# Altium PCB SPSU-Old.PcbDoc
Units mm, origin at the board's own origin, x right, y up, seen from the top; angles counter-clockwise.
Board outline 44.65 x 54.4 mm, 2 copper layers (Top, Bottom); 44 components, 39 nets, 162 pads, 320 vias.
Unrouted connection lines stored in the file: 2.
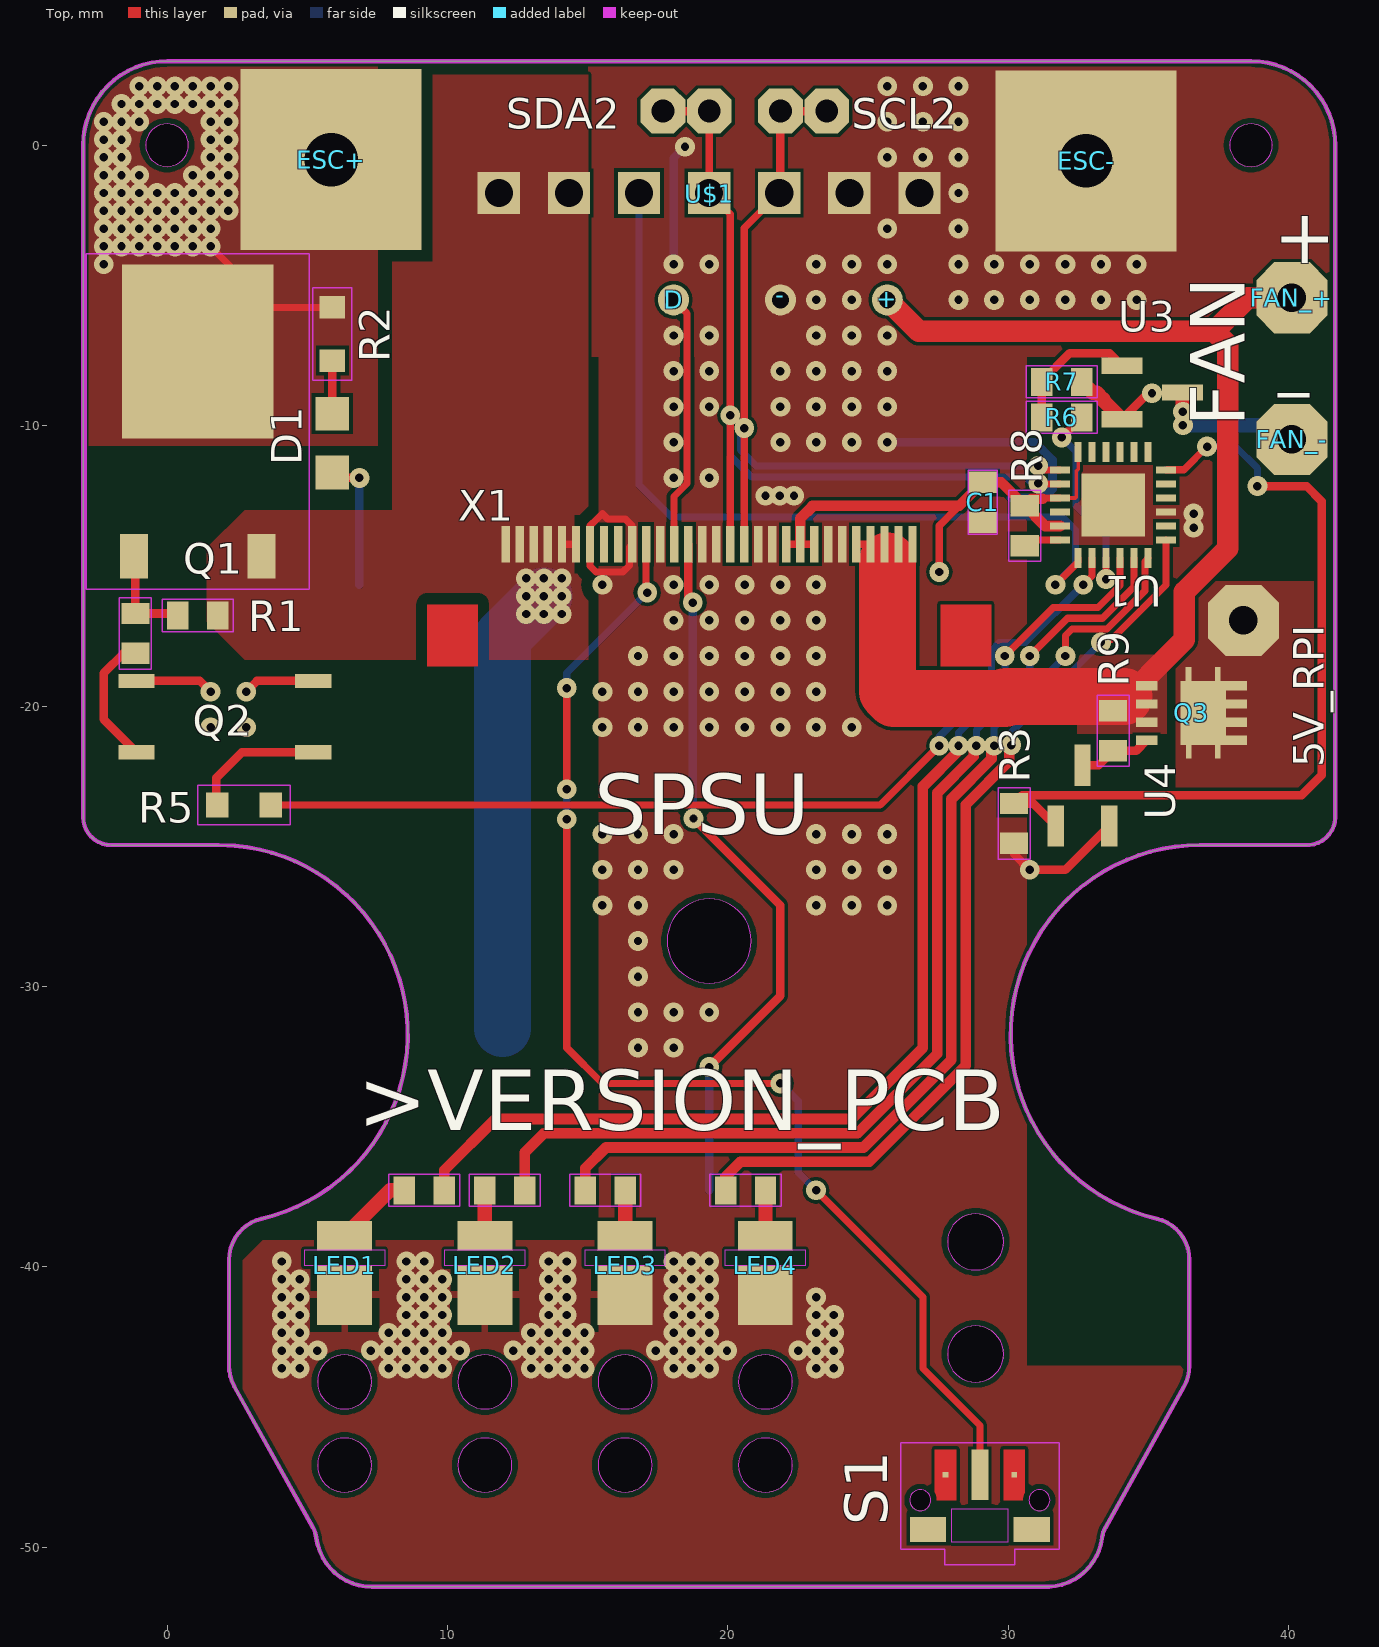
[diagram p0: Top view]
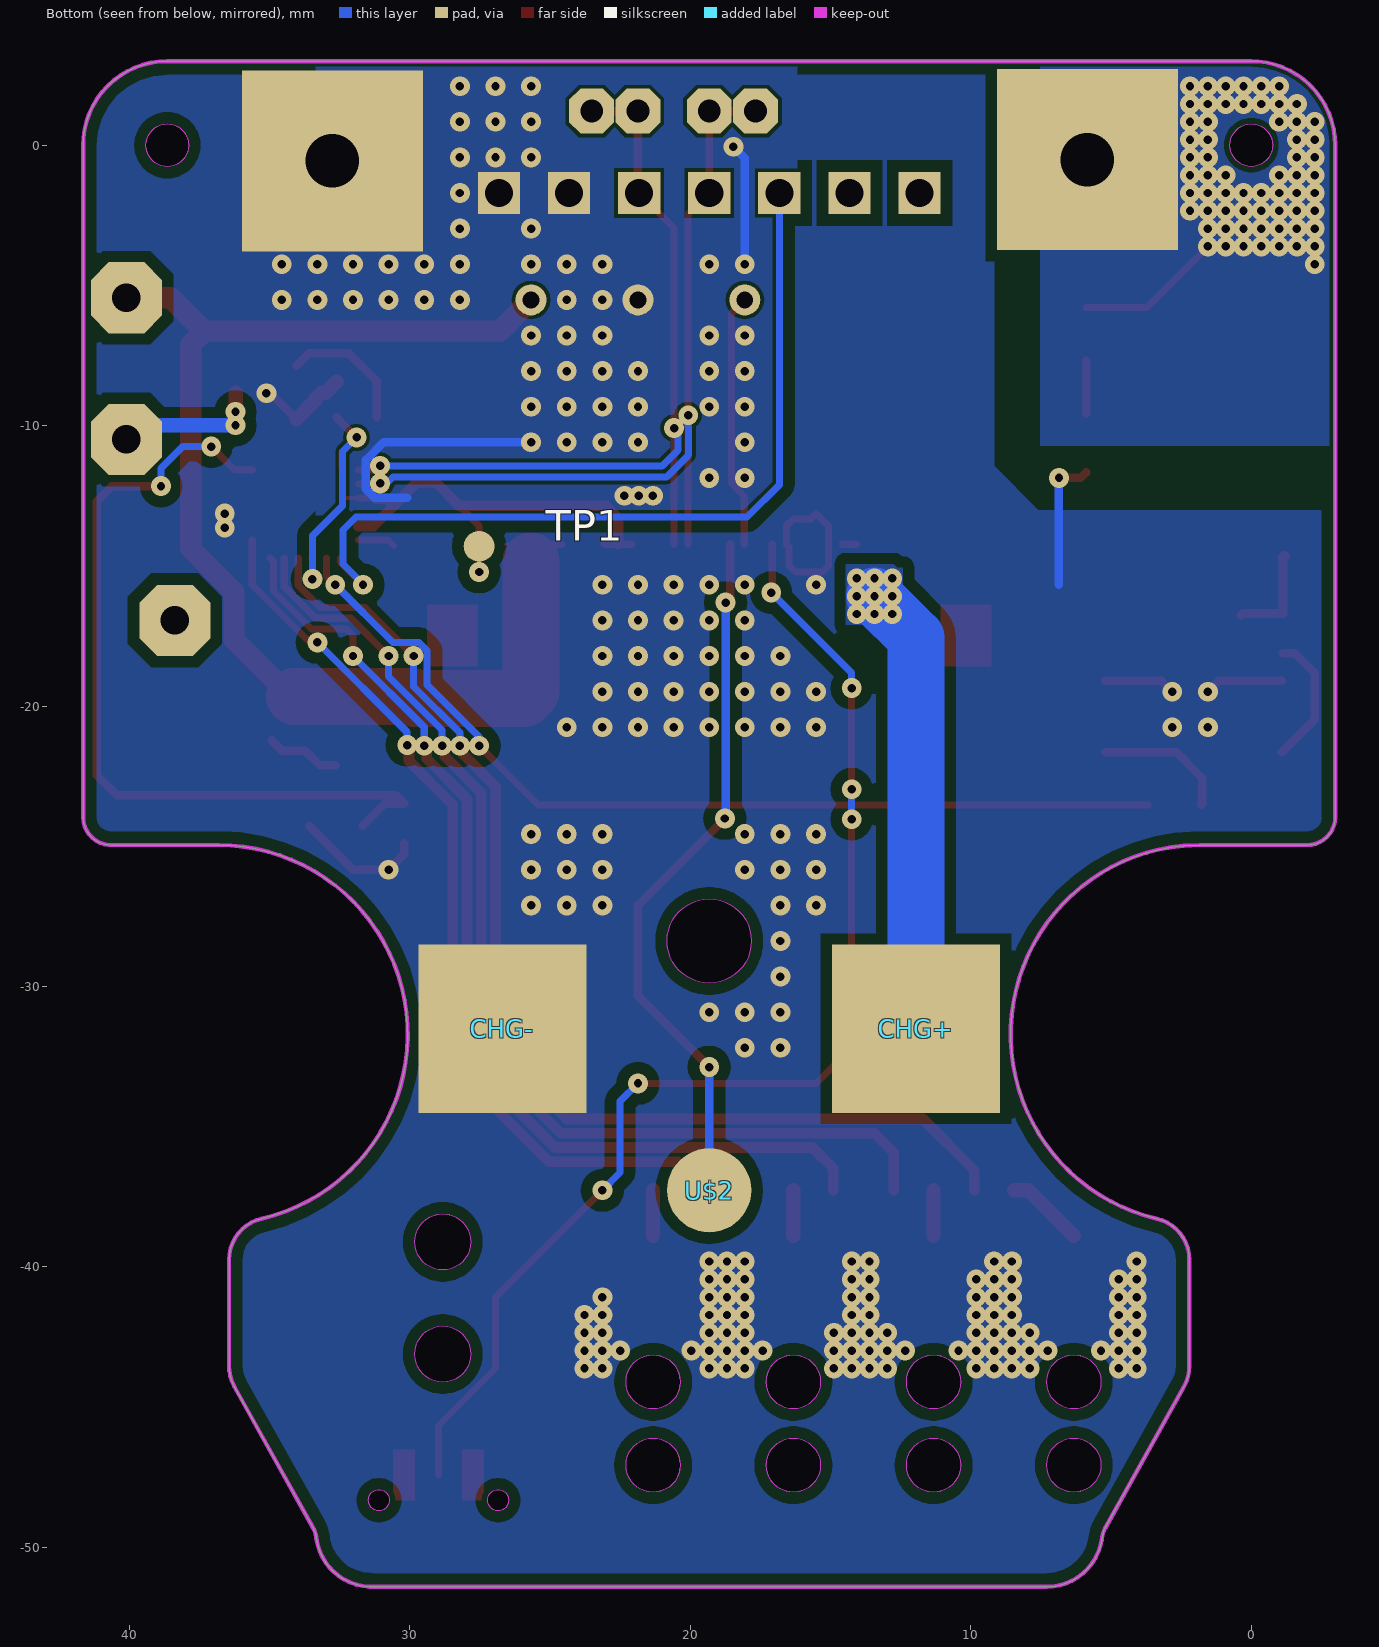
[diagram p1: Bottom view, seen from below]

## Layer stack, top to bottom
Top Solder: solder mask 0.0102, Solder Resist, Dk 3.5
Top: signal copper 0.035
Dielectric 1: dielectric 0.32, FR-4, Dk 4.8
Bottom: signal copper 0.035
Bottom Solder: solder mask 0.0102, Solder Resist, Dk 3.5

## Board outline
33.36,-49.536 33.343,-49.621 33.338,-49.655 cw(c31.354,-49.406) 31.453,-51.404 31.354,-51.406 7.307,-51.406 cw(c7.307,-49.406) 5.375,-49.924 5.337,-49.754 5.322,-49.655 5.286,-49.485 5.256,-49.403 5.22,-49.324 5.204,-49.294 2.399,-44.26 cw(c3.709,-43.529) 2.209,-43.53 2.209,-39.739 cw(c3.709,-39.739) 3.367,-38.279 ccw(c1.83,-31.706) 2.418,-24.982 1.83,-24.956 -1.993,-24.956 cw(c-1.993,-23.956) -2.993,-23.956 -2.993,-0.004 cw(c0.007,-0.004) -0.255,2.985 0.007,2.996 38.653,2.996 cw(c38.654,-0.004) 41.642,0.258 41.653,-0.004 41.653,-23.956 cw(c40.654,-23.956) 40.741,-24.952 40.653,-24.956 36.83,-24.956 ccw(c36.83,-31.706) 35.293,-38.279 cw(c34.951,-39.739) 36.451,-39.739 36.451,-43.53 cw(c34.951,-43.529) 36.262,-44.26 33.457,-49.294 ccw(c34.33,-49.781) 33.385,-49.453
cut-out: 19.33,-29.876 ccw(c19.33,-28.376) 20.83,-28.376 ccw(c19.33,-28.376) 19.33,-26.876 ccw(c19.33,-28.376) 17.83,-28.376 ccw(c19.33,-28.376)
cut-out: 28.83,-40.104 ccw(c28.83,-39.104) 29.83,-39.104 ccw(c28.83,-39.104) 28.83,-38.104 ccw(c28.83,-39.104) 27.83,-39.104 ccw(c28.83,-39.104)
cut-out: 28.83,-44.104 ccw(c28.83,-43.104) 29.83,-43.104 ccw(c28.83,-43.104) 28.83,-42.104 ccw(c28.83,-43.104) 27.83,-43.104 ccw(c28.83,-43.104)
cut-out: 16.33,-45.061 ccw(c16.33,-44.096) 17.295,-44.096 ccw(c16.33,-44.096) 16.33,-43.131 ccw(c16.33,-44.096) 15.365,-44.096 ccw(c16.33,-44.096)
cut-out: 11.33,-48.031 ccw(c11.33,-47.066) 12.295,-47.066 ccw(c11.33,-47.066) 11.33,-46.101 ccw(c11.33,-47.066) 10.365,-47.066 ccw(c11.33,-47.066)
cut-out: 16.33,-48.031 ccw(c16.33,-47.066) 17.295,-47.066 ccw(c16.33,-47.066) 16.33,-46.101 ccw(c16.33,-47.066) 15.365,-47.066 ccw(c16.33,-47.066)
cut-out: 21.33,-45.061 ccw(c21.33,-44.096) 22.295,-44.096 ccw(c21.33,-44.096) 21.33,-43.131 ccw(c21.33,-44.096) 20.365,-44.096 ccw(c21.33,-44.096)
cut-out: 21.33,-48.031 ccw(c21.33,-47.066) 22.295,-47.066 ccw(c21.33,-47.066) 21.33,-46.101 ccw(c21.33,-47.066) 20.365,-47.066 ccw(c21.33,-47.066)
cut-out: 6.33,-45.061 ccw(c6.33,-44.096) 7.295,-44.096 ccw(c6.33,-44.096) 6.33,-43.131 ccw(c6.33,-44.096) 5.365,-44.096 ccw(c6.33,-44.096)
cut-out: 11.33,-45.061 ccw(c11.33,-44.096) 12.295,-44.096 ccw(c11.33,-44.096) 11.33,-43.131 ccw(c11.33,-44.096) 10.365,-44.096 ccw(c11.33,-44.096)
cut-out: 6.33,-48.031 ccw(c6.33,-47.066) 7.295,-47.066 ccw(c6.33,-47.066) 6.33,-46.101 ccw(c6.33,-47.066) 5.365,-47.066 ccw(c6.33,-47.066)
cut-out: 38.651,-0.765 ccw(c38.651,-0.003) 39.413,-0.003 ccw(c38.651,-0.003) 38.651,0.759 ccw(c38.651,-0.003) 37.889,-0.003 ccw(c38.651,-0.003)
cut-out: 0,-0.762 ccw(c0,0) 0.762,0 ccw(c0,0) 0,0.762 ccw(c0,0) -0.762,0 ccw(c0,0)
cut-out: 31.107,-48.69 ccw(c31.107,-48.315) 31.482,-48.315 ccw(c31.107,-48.315) 31.107,-47.94 ccw(c31.107,-48.315) 30.732,-48.315 ccw(c31.107,-48.315)
cut-out: 26.857,-48.69 ccw(c26.857,-48.315) 27.232,-48.315 ccw(c26.857,-48.315) 26.857,-47.94 ccw(c26.857,-48.315) 26.482,-48.315 ccw(c26.857,-48.315)

## Design rules (kind name [scope] priority, off if disabled: settings)
BoardOutlineClearance mdCopperDimension [All] p1: gap=0.254 ignorepadtopadclearanceinfootprint=FALSE except(0: Arc-SplitContinuation Track-SplitContinuation SMDPad-SplitContinuation THPad-SplitContinuation Via-SplitContinuation Fill-SplitContinuation Poly-SplitContinuation Region-SplitContinuation Text-SplitContinuation; 0.2: Poly-OutlineEdge Poly-CavityEdge Poly-CutoutEdge Poly-SplitBarrior)
Clearance Clearance_for_PolygonClass_Isolate_16 [InPolygonClass('Isolate_16') vs IsArc Or IsTrack Or IsPad Or IsVia Or IsFill Or IsRegion Or IsText] p1: gap=0.406 ignorepadtopadclearanceinfootprint=FALSE
Clearance "Clearance (Same Net)" [All] p2: gap=0.127 ignorepadtopadclearanceinfootprint=FALSE
Clearance [All] p3: gap=0.127 ignorepadtopadclearanceinfootprint=FALSE
HoleSize [All] p1: absolutevalues=TRUE maxlimit=2540 minlimit=0.3 maxpercent=80.000 minpercent=20.000
HoleToHoleClearance mdDrill [All] p1: gap=0.152 allowstackedmicrovias=TRUE
MinimumSolderMaskSliver [All] p1 off: minsoldermaskwidth=0.254
PasteMaskExpansion Expansion_SMDPaste_OFF [InPadClass('SMDPaste_OFF')] p1: expansion=0
PasteMaskExpansion mlMinCreamFrame [All] p2: expansion=0
PolygonConnect PolygonConnect_For_PolygonThermal_ON_Width100000_Gap100000 [InPolygonClass('PolygonThermal_ON_Width100000_Gap100000') vs Not IsVia] p1: connectstyle=Relief reliefconductorwidth=0.254 reliefentries=4 polygonreliefangle="90 Angle" airgapwidth=0.254
PolygonConnect PolygonConnect_For_PolygonThermal_OFF [InPolygonClass('PolygonThermal_OFF')] p2: connectstyle=Direct reliefconductorwidth=0.254 reliefentries=4 polygonreliefangle="90 Angle" airgapwidth=0.254
PolygonConnect ThermalVias [IsVia] p3: connectstyle=Direct reliefconductorwidth=0.254 reliefentries=4 polygonreliefangle="90 Angle" airgapwidth=0.254
PolygonConnect [All] p4: connectstyle=Relief reliefconductorwidth=0.254 reliefentries=4 polygonreliefangle="90 Angle" airgapwidth=0.254
RoutingVias [All] p1: holewidth=0.3 width=0.452 viastyle="Through Hole" minholewidth=0.3 minwidth=0.452 maxholewidth=2.54 maxwidth=2.54
SolderMaskExpansion Expansion_SMDSolder_OFF [InPadClass('SMDSolder_OFF')] p1: expansion=0 istentingtop=FALSE
SolderMaskExpansion mlMinStopFrame [All] p2: expansion=0.102 istentingtop=FALSE
Width [All] p1: maxlimit=0.254 minlimit=0.127 preferedwidth=0.127
26 further rules are at their usual default settings.

## Classes and differential pairs
polygon class PolygonThermal_ON_Width100000_Gap100000: Polygon_3_Net_+12V Polygon_4_Net_0V
polygon class PolygonThermal_OFF: C Polygon_1_Net_0V Polygon_1_Net_+5V Polygon_1_Net_+5V_RPI Polygon_1_Net_ESC_+ Polygon_2_Net_+12V Polygon_2_Net_ESC_+ Polygon_3_Net_0V Polygon_5_Net_0V Polygon_6_Net_0V
polygon class Isolate_16: C Polygon_2_Net_+12V
pad class SMDSolder_OFF: S1-1 S1-3 X1-1 X1-2 X1-3 X1-4 X1-5 X1-6 X1-7 X1-8 X1-9 X1-10 X1-11 X1-12 X1-13 X1-14 X1-15 X1-16 X1-17 X1-18 X1-19 X1-20 X1-21 X1-22 X1-23 X1-24 X1-25 X1-26 X1-27 X1-28 X1-29 X1-30
pad class SMDPaste_OFF: S1-1 S1-3 TP1-TP X1-1 X1-2 X1-3 X1-4 X1-5 X1-6 X1-7 X1-8 X1-9 X1-10 X1-11 X1-12 X1-13 X1-14 X1-15 X1-16 X1-17 X1-18 X1-19 X1-20 X1-21 X1-22 X1-23 X1-24 X1-25 X1-26 X1-27 X1-28 X1-29 X1-30

## Components (designator, comment, footprint, x,y, rotation, side; value= is the part's Value field where it differs from the comment)
5V_RPI "WIREPAD2,54/1,0" 2,54/1,0 38.38,-16.946 r90 top
+ "" TH-0.75/0.6 25.68,-5.516 r0 top
- "" TH-0.75/0.6 21.87,-5.516 r0 top
C1 "100nF" C0603 29.084,-12.734 r90 top
CHG+ "" SMT-PAD_SQ6MM 11.957,-31.504 r180 bottom
CHG- "" SMT-PAD_SQ6MM 26.703,-31.504 r180 bottom
D "" TH-0.75/0.6 18.06,-5.516 r0 top
D1 "" CHIPLED_0805 5.894,-10.622 r180 top
ESC+ "" ESC 5.849,-0.519 r180 top
ESC- "" ESC 32.767,-0.563 r0 top
FAN_+ "WIREPAD2,54/1,0" 2,54/1,0 40.107,-5.44 r0 top
FAN_- "WIREPAD2,54/1,0" 2,54/1,0 40.107,-10.495 r0 top
LED1 "JE2835AWTLED_JE2835_CRW-L" LED_JE2835_CRW-L 6.33,-40.206 r90 top
LED2 "JE2835AWTLED_JE2835_CRW-L" LED_JE2835_CRW-L 11.33,-40.206 r90 top
LED3 "JE2835AWTLED_JE2835_CRW-L" LED_JE2835_CRW-L 16.33,-40.206 r90 top
LED4 "JE2835AWTLED_JE2835_CRW-L" LED_JE2835_CRW-L 21.33,-40.206 r90 top
Q1 "FDD4141TO252" TO252 1.093,-9.86 r0 top
Q2 "EL357N" EL357N(C)(TA)-VG_EVE-L 2.058,-20.375 r180 top
Q3 "" POWERDI3333-8_3P3X3P3_DIO 36.526,-20.248 r0 top
R1 "100k" R0603#1 1.093,-16.768 r0 top
R2 "150" R0603#2 5.894,-6.735 r270 top
R3 "100k" R0603#1 30.201,-24.185 r90 top
R4 "4k7" R0603#1 -1.13,-17.41 r270 top
R5 "200" R0603#2 2.744,-23.525 r180 top
R6 "4k7" R0603#1 31.903,-9.707 r0 top
R7 "100k" R0603#1 31.903,-8.437 r180 top
R8 "100k" R0603#1 30.582,-13.568 r270 top
R9 "100k" R0603#1 33.732,-20.883 r90 top
R10 "150R" R0603#1 9.17,-37.266 r0 top
R11 "150R" R0603#1 12.04,-37.266 r0 top
R12 "150R" R0603#1 15.622,-37.266 r180 top
R13 "150R" R0603#1 20.626,-37.266 r180 top
S1 "TL3340AF160QG" SW_TL3340AF160QG 28.982,-48.315 r0 top
SCL1 "" 1,6/0,8 21.87,1.215 r0 top
SCL2 "" 1,6/0,8 23.521,1.215 r0 top
SDA1 "" 1,6/0,8 17.679,1.215 r0 top
SDA2 "" 1,6/0,8 19.33,1.215 r0 top
TP1 "TPTP11R" TP11R 27.534,-14.305 r180 bottom
U1 "PCAL6416AHF,128HWQFN24_PCAL_NXP-L" HWQFN24_PCAL_NXP-L 33.732,-12.831 r90 top locked
U3 "2N7002,215TO-236AB_NEX-M" TO-236AB_NEX-M 35.129,-8.818 r270 top
U4 "" TO-236AB_NEX-M 32.64,-23.195 r0 top
U$1 "" BATT_CON_THT 19.33,-1.706 r180 top
U$2 "" SMT-PAD_R3MM 19.33,-37.266 r180 bottom
X1 "FH12-30S-0.5SH" FH12-30S-0.5SH 19.33,-17.48 r0 top

## Footprints (in the part's own frame and the unit in brackets; to place one, negate y for a bottom-side part, rotate by r counter-clockwise, add the part's x,y. Pads: shape width x height; smd on the part's side, far side on the other; paste and mask are expansions set on the pad)
1,6/0,8 [mil] "1,6/0,8"
  oct 63x63 / inner round 58.2 / far side oct 63x63 hole 32: 1(0,0)
2,54/1,0 [mil] "2,54/1,0"
  oct 100x100 / inner round 92.39 / far side oct 100x100 hole 40: 1(0,0)
BATT_CON_THT [mm] "BATT_CON_THT"
  rect 1.508x1.508 / inner round 1.393 / far side rect 1.508x1.508 hole 1: P$1(-7.498,0) P$2(-4.998,0) P$3(-2.498,0) P$4(0.002,0) P$5(2.502,0) P$6(5.002,0) P$7(7.502,0)
C0603 [mil] "C0603"
  rect 30x39.4 smd: 1(-28,0) 2(28,0)
  Top keep-out lines w2: -44.96,20.56 -44.96,-20.56 44.96,-20.56 44.96,20.56 -44.96,20.56
CHIPLED_0805 [mm] "CHIPLED_0805"
  rect 1.2x1.2 smd: A(0,-1.05) C(0,1.05)
EL357N(C)(TA)-VG_EVE-L [mil] "EL357N(C)(TA)-VG_EVE-L"
  rect 51x20 smd: 1(-124,50) 2(-124,-50) 3(124,-50) 4(124,50)
ESC [mil] "ESC"
  rect 254x254 / inner round 234.67 / far side rect 254x254 hole 75: P$1(0,0)
FH12-30S-0.5SH [mm] "FH12-30S-0.5SH"
  rect 0.3x1.3 smd paste+0 mask+0: 1(-7.25,3.25) 2(-6.75,3.25) 3(-6.25,3.25) 4(-5.75,3.25) 5(-5.25,3.25) 6(-4.75,3.25) 7(-4.25,3.25) 8(-3.75,3.25) 9(-3.25,3.25) 10(-2.75,3.25) 11(-2.25,3.25) 12(-1.75,3.25) 13(-1.25,3.25) 14(-0.75,3.25) 15(-0.25,3.25) 16(0.25,3.25) 17(0.75,3.25) 18(1.25,3.25) 19(1.75,3.25) 20(2.25,3.25) 21(2.75,3.25) 22(3.25,3.25) 23(3.75,3.25) 24(4.25,3.25) 25(4.75,3.25) 26(5.25,3.25) 27(5.75,3.25) 28(6.25,3.25) 29(6.75,3.25) 30(7.25,3.25)
  Top region: -8.25,1.1 -8.25,-1.1 -10.05,-1.1 -10.05,1.1
  Top region: 10.05,1.1 10.05,-1.1 8.25,-1.1 8.25,1.1
HWQFN24_PCAL_NXP-L [mil] "HWQFN24_PCAL_NXP-L"
  rect 27.87x10.03 smd: 1(-74.44,49.23) 2(-74.44,29.53) 3(-74.44,9.85) 4(-74.44,-9.85) 5(-74.44,-29.53) 6(-74.44,-49.23) 13(74.44,-49.23) 14(74.44,-29.53) 15(74.44,-9.85) 16(74.44,9.85) 17(74.44,29.53) 18(74.44,49.23)
  rect 10.03x27.87 smd: 7(-49.23,-74.44) 8(-29.53,-74.44) 9(-9.85,-74.44) 10(9.85,-74.44) 11(29.53,-74.44) 12(49.23,-74.44) 19(49.23,74.44) 20(29.53,74.44) 21(9.85,74.44) 22(-9.85,74.44) 23(-29.53,74.44) 24(-49.23,74.44)
  rect 89x89 smd: 25(0,0)
LED_JE2835_CRW-L [mil] "LED_JE2835_CRW-L"
  rect 84x77 smd: 1(-31,0)
  rect 42x77 smd: 2(52,0)
  Top keep-out region: 10,56 32,56 32,-56 10,-56
  Top keep-out region: 10,56 32,56 32,-56 10,-56
POWERDI3333-8_3P3X3P3_DIO [mil] "POWERDI3333-8_3P3X3P3_DIO"
  rect 30x13 smd: 1(-63,38.39) 2(-63,12.8) 3(-63,-12.8) 4(-63,-38.39) 5(63,-38.39) 6(63,-12.8) 7(63,12.8) 8(63,38.39)
  rect 64x90 smd: 9(16.35,0)
  rect 8x20 smd: 10(-4.1,54.9) 11(37,54.9) 12(-4,-54.1) 13(37,-54.1)
R0603#1 [mil] "R0603"
  rect 30x39.4 smd: 1(-28,0) 2(28,0)
  Top keep-out lines w2: -49.96,-22.56 -49.96,22.56 49.96,22.56 49.96,-22.56 -49.96,-22.56
R0603#2 [mil] "R0603"
  rect 31.5x35.43 smd: 1(-37.4,0) 2(37.4,0)
  Top keep-out lines w2: 64.96,-27.56 -64.96,-27.56 -64.96,27.56 64.96,27.56 64.96,-27.56
SMT-PAD_R3MM [mm] "SMT-PAD_R3MM"
  rrect100% 3x3 smd: P$1(0,0)
SMT-PAD_SQ6MM [mm] "SMT-PAD_SQ6MM"
  rect 6x6 smd: P$1(0,0)
SW_TL3340AF160QG [mm] "SW_TL3340AF160QG"
  rect 0.2x0.2 smd paste+0 mask+0: 1(-1.225,0.9) 3(1.225,0.9)
  rect 0.6x1.8 smd: 2(0,0.9)
  rect 1.3x0.9 smd: S1(-1.85,-1.05) S2(1.85,-1.05)
  Top region: -1.605,1.805 -0.845,1.805 -0.845,-0.005 -1.53,-0.005 -1.53,0.009 -1.53,0.027 -1.531,0.044 -1.533,0.062 -1.535,0.071 -1.536,0.08 -1.538,0.097 -1.541,0.115 -1.545,0.133 -1.547,0.141 -1.55,0.152 -1.555,0.174 -1.562,0.194 -1.57,0.215 -1.574,0.226 -1.577,0.234 -1.584,0.25 -1.591,0.265 -1.6,0.28 -1.605,0.289 -1.605,0.3
  Top region: 1.605,1.805 0.845,1.805 0.845,-0.005 1.53,-0.005 1.53,0.009 1.53,0.027 1.531,0.044 1.533,0.062 1.535,0.071 1.536,0.08 1.538,0.097 1.541,0.115 1.545,0.133 1.547,0.141 1.55,0.152 1.555,0.174 1.562,0.194 1.57,0.215 1.574,0.226 1.577,0.234 1.584,0.25 1.591,0.265 1.6,0.28 1.605,0.289 1.605,0.3
  Top keep-out region: -1,-1.5 -1,-0.3 1,-0.3 1,-1.5
  Top keep-out region: -1,-1.5 -1,-0.3 1,-0.3 1,-1.5
  Top keep-out lines w0.05: -2.825,-1.75 -1.25,-1.75 -1.25,-2.3 1.25,-2.3 1.25,-1.75 2.825,-1.75 2.825,2.05 -2.825,2.05 -2.825,-1.75
TH-0.75/0.6 [mm] "TH-0.75/0.6"
  round 1.108 hole 0.6: P$2(0,0)
TO252 [mm] "TO252"
  rect 1x1.6 smd: 1(-2.28,-4.8) 2(2.28,-4.8)
  rect 5.4x6.2 smd: 3(0,2.5)
  Top keep-out lines w0.051: -3.973,-5.983 -3.973,5.983 3.973,5.983 3.973,-5.983 -3.973,-5.983
TO-236AB_NEX-M [mil] "TO-236AB_NEX-M"
  rect 23x58 smd: 1(-37.5,-42.5) 2(37.5,-42.5) 3(0,42.5)
TP11R [mm] "TP11R"
  rrect100% 1.1x1.1 smd paste+0: TP(0,0)

## Part data
5V_RPI FAN_+ FAN_-: library part 2,54/1,0, PackageName=2,54/1,0
+ - D: library part TH-0.75/0.6, PackageName=TH-0.75/0.6
C1: library part C0603, PackageName=C0603
CHG+ CHG-: library part SMT-PAD_SQ6MM, PackageName=SMT-PAD_SQ6MM
D1: library part CHIPLED_0805, PackageName=CHIPLED_0805
ESC+ ESC-: library part ESC, PackageName=ESC
LED1 LED2 LED3 LED4: library part LED_JE2835_CRW-L, PackageName=LED_JE2835_CRW-L
Q1: library part TO252, PackageName=TO252
Q2: library part EL357N(C)(TA)-VG_EVE-L, PackageName=EL357N(C)(TA)-VG_EVE-L
Q3: library part POWERDI3333-8_3P3X3P3_DIO, PackageName=POWERDI3333-8_3P3X3P3_DIO
R1 R2 R3 R4 R5 R6 R7 R8 R9 R10 R11 R12 R13: library part R0603, PackageName=R0603
S1: library part SW_TL3340AF160QG, PackageName=SW_TL3340AF160QG
SCL1 SCL2 SDA1 SDA2: library part 1,6/0,8, PackageName=1,6/0,8
TP1: library part TP11R, PackageName=TP11R
U1: library part HWQFN24_PCAL_NXP-L, PackageName=HWQFN24_PCAL_NXP-L
U3 U4: library part TO-236AB_NEX-M, PackageName=TO-236AB_NEX-M
U$1: library part BATT_CON_THT, PackageName=BATT_CON_THT
U$2: library part SMT-PAD_R3MM, PackageName=SMT-PAD_R3MM
X1: PackageName=FH12-30S-0.5SH

## Free pads (board coordinates)
  round 1.93 hole 1.93 unplated: MH1(21.33,-47.066) MH2(21.33,-44.096) MH3(6.33,-44.096) MH4(6.33,-47.066) MH5(11.33,-44.096) MH6(16.33,-47.066) MH7(16.33,-44.096) MH8(11.33,-47.066)
  round 0.75 hole 0.75 unplated: MH1(26.857,-48.315) MH2(31.107,-48.315)
  round 2 hole 2 unplated: MH9(28.83,-39.104) MH10(28.83,-43.104)
  round 1.524 hole 1.524 unplated: MH11(0,0) MH12(38.651,-0.003)
  round 3 hole 3 unplated: MH13(19.33,-28.376)

## Via types
v1: diameter 0.706/0.706 (per signal layer), hole 0.3, Top to Bottom, 320 vias

## Nets (pads, with @x,y where several pads share a name; then routed paths per layer and width w, separated by ;. In a path a pad name is that pad's centre, name@x,y a point inside that pad or via, vN(x,y) a via of type N, cw(c..) or ccw(c..) an arc to the next point about the centre after c; other vN are vias at no path point)
0V: -.P$2 C1.1 CHG-.P$1 D1.C ESC-.P$1 LED1.1 LED2.1 LED3.1 LED4.1 Q2.2 Q2.3 R3.1 R7.1 S1.1 S1.3 U1.9 U1.25 U3.2 U4.2 U$1.P$1 U$1.P$2 X1.7 X1.10 X1.12 X1.15 X1.16 X1.19 X1.20 X1.24 X1.25 | length 37.8
  Top w0.254: 15.08,-15.008 15.292,-15.219 16.25,-15.219 16.484,-14.985 16.484,-14.326 X1.10 16.58,-13.57 16.335,-13.326 15.71,-13.326 15.52,-13.136 15.331,-13.326 15.325,-13.326 15.08,-13.57 X1.7 15.08,-15.008
  Top w0.305: Q2.3 1.169,-19.105 v1(1.55,-19.486) ; v1(2.82,-19.486) 3.201,-19.105 Q2.2 ; D1.C 6.088,-11.866 v1(6.859,-11.866) ; R3.1 30.201,-25.277 v1(30.76,-25.836) 32.03,-25.836 U4.2 ; U3.2 34.977,-8.844 v1(35.119,-8.844)
  Top w0.508: R7.1 33.003,-8.826 33.153,-8.826 33.376,-9.049 33.376,-9.098 U3.2
  Bottom w0.305: 6.859,-15.676 v1(6.859,-11.866) ; v1(18.06,-4.246) 18.06,-0.462 v1(18.467,-0.055) ; v1(25.68,-10.596) 30.942,-10.596 31.571,-11.225 31.571,-12.271 31.275,-12.567 30.089,-12.567
  other v1: 4.09,-43.616 4.725,-43.616 7.9,-43.616 8.535,-43.616 9.17,-43.616 9.805,-43.616 12.98,-43.616 13.615,-43.616 14.25,-43.616 14.885,-43.616 18.06,-43.616 18.695,-43.616 19.33,-43.616 23.14,-43.616 23.775,-43.616 4.09,-42.981 4.725,-42.981 5.36,-42.981 7.265,-42.981 7.9,-42.981 8.535,-42.981 9.17,-42.981 9.805,-42.981 10.44,-42.981 12.345,-42.981 12.98,-42.981 13.615,-42.981 14.25,-42.981 14.885,-42.981 17.425,-42.981 18.06,-42.981 18.695,-42.981 19.33,-42.981 19.965,-42.981 22.505,-42.981 23.14,-42.981 23.775,-42.981 4.09,-42.346 4.725,-42.346 7.9,-42.346 8.535,-42.346 9.17,-42.346 9.805,-42.346 12.98,-42.346 13.615,-42.346 14.25,-42.346 14.885,-42.346 18.06,-42.346 18.695,-42.346 19.33,-42.346 23.14,-42.346 23.775,-42.346 4.09,-41.711 4.725,-41.711 8.535,-41.711 9.17,-41.711 9.805,-41.711 13.615,-41.711 14.25,-41.711 18.06,-41.711 18.695,-41.711 19.33,-41.711 23.14,-41.711 23.775,-41.711 4.09,-41.076 4.725,-41.076 8.535,-41.076 9.17,-41.076 9.805,-41.076 13.615,-41.076 14.25,-41.076 18.06,-41.076 18.695,-41.076 19.33,-41.076 23.14,-41.076 4.09,-40.441 4.725,-40.441 8.535,-40.441 9.17,-40.441 9.805,-40.441 13.615,-40.441 14.25,-40.441 18.06,-40.441 18.695,-40.441 19.33,-40.441 4.09,-39.806 8.535,-39.806 9.17,-39.806 13.615,-39.806 14.25,-39.806 18.06,-39.806 18.695,-39.806 19.33,-39.806 16.79,-32.186 18.06,-32.186 16.79,-30.916 18.06,-30.916 19.33,-30.916 16.79,-29.646 16.79,-28.376 15.52,-27.106 16.79,-27.106 23.14,-27.106 24.41,-27.106 25.68,-27.106 15.52,-25.836 16.79,-25.836 18.06,-25.836 23.14,-25.836 24.41,-25.836 25.68,-25.836 15.52,-24.566 16.79,-24.566 18.06,-24.566 23.14,-24.566 24.41,-24.566 25.68,-24.566 1.55,-20.756 2.82,-20.756 15.52,-20.756 16.79,-20.756 18.06,-20.756 19.33,-20.756 20.6,-20.756 21.87,-20.756 23.14,-20.756 24.41,-20.756 15.52,-19.486 16.79,-19.486 18.06,-19.486 19.33,-19.486 20.6,-19.486 21.87,-19.486 23.14,-19.486 16.79,-18.216 18.06,-18.216 19.33,-18.216 20.6,-18.216 21.87,-18.216 23.14,-18.216 18.06,-16.946 19.33,-16.946 20.6,-16.946 21.87,-16.946 23.14,-16.946 15.52,-15.676 18.06,-15.676 19.33,-15.676 20.6,-15.676 21.87,-15.676 23.14,-15.676 36.602,-13.644 36.602,-13.136 21.337,-12.501 21.845,-12.501 22.353,-12.501 18.06,-11.866 19.33,-11.866 18.06,-10.596 21.87,-10.596 23.14,-10.596 24.41,-10.596 18.06,-9.326 19.33,-9.326 21.87,-9.326 23.14,-9.326 24.41,-9.326 25.68,-9.326 18.06,-8.056 19.33,-8.056 21.87,-8.056 23.14,-8.056 24.41,-8.056 25.68,-8.056 18.06,-6.786 19.33,-6.786 23.14,-6.786 24.41,-6.786 25.68,-6.786 23.14,-5.516 24.41,-5.516 28.22,-5.516 29.49,-5.516 30.76,-5.516 32.03,-5.516 33.3,-5.516 34.57,-5.516 19.33,-4.246 23.14,-4.246 24.41,-4.246 25.68,-4.246 28.22,-4.246 29.49,-4.246 30.76,-4.246 32.03,-4.246 33.3,-4.246 34.57,-4.246 25.68,-2.976 28.22,-2.976 28.22,-1.706 25.68,-0.436 26.95,-0.436 28.22,-0.436 25.68,0.834 26.95,0.834 28.22,0.834 25.68,2.104 26.95,2.104 28.22,2.104
+5V: +.P$2 FAN_+.1 Q3.1 Q3.2 Q3.3 R9.2 X1.26 X1.27 X1.28 X1.29 X1.30 | length 46.7
  Top w0.127: X1.27 X1.28 ; X1.29 X1.30
  Top w0.254: X1.26 X1.27 ; X1.28@25.68,-14.83 25.68,-14.329 X1.28 X1.29
  Top w0.762: +.P$2 26.798,-6.634 37.339,-6.634 ; R9.2 36.272,-17.632 36.272,-15.93 37.821,-14.381 37.821,-7.116 37.339,-6.634 ; FAN_+.1 38.533,-5.44 37.339,-6.634
  Top w2.032: X1.28@25.68,-14.83 25.68,-19.486 25.917,-19.723 29.854,-19.723 29.912,-19.664 34.113,-19.664
+5V_RPI: 5V_RPI.1 Q3.5 Q3.6 Q3.7 Q3.8 Q3.9 Q3.10 Q3.11 Q3.12 Q3.13
+12V: CHG+.P$1 Q1.2 R1.2 U$1.P$6 U$1.P$7 X1.1 X1.2 X1.3 X1.4 X1.5 X1.6 | length 16.5
  Top w0.254: X1.5 X1.6
  Bottom w2.032: CHG+.P$1 11.957,-17.563 v1(13.437,-16.083)
  other v1: 12.802,-16.718 13.437,-16.718 14.072,-16.718 12.802,-16.083 14.072,-16.083 12.802,-15.448 13.437,-15.448 14.072,-15.448
DOCK-COMM: U$2.P$1 X1.14 | length 25.5
  Top w0.305: X1.14 18.58,-16.145 v1(18.746,-16.311) ; v1(18.771,-24.007) 21.87,-27.106 21.87,-30.332 v1(19.33,-32.872)
  Bottom w0.305: v1(18.746,-16.311) 18.746,-24.007 v1(18.771,-24.007) ; U$2.P$1 v1(19.33,-32.872)
ESC_+: ESC+.P$1 Q1.3 R2.1 | length 5.2
  Top w0.254: v1(1.55,-3.611) 3.724,-5.785 R2.1
  other v1: -2.26,-4.246 -2.26,-3.611 -1.625,-3.611 -0.99,-3.611 -0.355,-3.611 0.28,-3.611 0.915,-3.611 -2.26,-2.976 -1.625,-2.976 -0.99,-2.976 -0.355,-2.976 0.28,-2.976 0.915,-2.976 1.55,-2.976 -2.26,-2.341 -1.625,-2.341 -0.99,-2.341 -0.355,-2.341 0.28,-2.341 0.915,-2.341 1.55,-2.341 2.185,-2.341 -2.26,-1.706 -1.625,-1.706 -0.99,-1.706 -0.355,-1.706 0.28,-1.706 0.915,-1.706 1.55,-1.706 2.185,-1.706 -2.26,-1.071 -1.625,-1.071 -0.99,-1.071 0.915,-1.071 1.55,-1.071 2.185,-1.071 -2.26,-0.436 -1.625,-0.436 1.55,-0.436 2.185,-0.436 -2.26,0.199 -1.625,0.199 1.55,0.199 2.185,0.199 -2.26,0.834 -1.625,0.834 -0.99,0.834 1.55,0.834 2.185,0.834 -1.625,1.469 -0.99,1.469 -0.355,1.469 0.28,1.469 0.915,1.469 1.55,1.469 2.185,1.469 -0.99,2.104 -0.355,2.104 0.28,2.104 0.915,2.104 1.55,2.104 2.185,2.104
IO_P0_0: U1.1 U$1.P$5 | length 30.2
  Top w0.254: v1(31.675,-15.676) 32.482,-14.869 U1.1
  Bottom w0.254: U$1.P$5 16.828,-12.107 17.984,-13.263 31.929,-13.263 32.386,-13.72 32.386,-14.94 31.675,-15.651 v1(31.675,-15.676)
IO_P0_1: R5.1 U1.2 | length 34.2
  Top w0.254: R5.1 25.426,-23.525 v1(27.534,-21.417) ; v1(32.665,-15.676) 32.982,-15.359 U1.2
  Bottom w0.254: v1(27.534,-21.417) 27.534,-21.095 29.391,-19.239 29.391,-18.017 29.672,-17.736 30.605,-17.736 v1(32.665,-15.676)
IO_P0_2: R6.2 U1.3 | length 7.5
  Top w0.254: v1(33.478,-15.473) 33.478,-14.726 U1.3
  Top w0.305: v1(31.901,-10.418) 31.903,-10.418 R6.2
  Bottom w0.254: v1(31.901,-10.418) 32.409,-10.926 32.409,-12.857 33.478,-13.926 v1(33.478,-15.473)
IO_P0_3: U1.4 | length 40.9
  Top w0.254: v1(29.871,-18.216) 31.598,-16.489 33.199,-16.489 33.982,-15.706 U1.4
  Top w0.381: 9.881,-37.266 9.881,-36.555 11.71,-34.726 24.41,-34.726 26.95,-32.186 26.95,-22.864 28.22,-21.594 v1(28.22,-21.417)
  Bottom w0.254: v1(28.22,-21.417) 28.22,-20.948 29.871,-19.297 v1(29.871,-18.216)
IO_P0_4: U1.5 | length 38.8
  Top w0.254: v1(30.76,-18.216) 32.106,-16.87 33.356,-16.87 34.482,-15.744 U1.5
  Top w0.381: 12.752,-37.266 12.752,-35.92 13.437,-35.234 24.62,-35.234 27.458,-32.396 27.458,-23.1 28.764,-21.794 28.764,-21.508 v1(28.855,-21.417)
  Bottom w0.254: v1(28.855,-21.417) 28.855,-20.852 30.76,-18.947 v1(30.76,-18.216)
IO_P0_5: U1.6 | length 37
  Top w0.254: v1(32.03,-18.216) 32.03,-17.485 32.264,-17.251 33.514,-17.251 34.864,-15.902 34.864,-14.841 U1.6
  Top w0.381: 14.911,-37.266 14.911,-36.479 15.647,-35.742 24.831,-35.742 27.966,-32.607 27.966,-23.311 29.399,-21.878 29.399,-21.508 v1(29.49,-21.417)
  Bottom w0.254: v1(29.49,-21.417) 29.49,-20.756 v1(32.03,-18.216)
IO_P0_6: U1.7 | length 32.5
  Top w0.254: v1(33.3,-17.731) 33.399,-17.632 33.672,-17.632 35.623,-15.681 U1.7
  Top w0.381: 19.914,-37.266 19.914,-36.784 20.448,-36.25 25.041,-36.25 28.474,-32.817 28.474,-23.521 30.034,-21.961 30.034,-21.457 v1(30.1,-21.391)
  Bottom w0.254: v1(30.1,-21.391) 30.1,-20.932 v1(33.3,-17.731)
IO_P0_7: U1.8
IO_P1_0: U1.10
IO_P1_1: U1.11
IO_P1_2: R3.2 U1.12 U4.1 | length 30.1
  Top w0.254: U1.12 35.631,-11.573 36.261,-11.573 v1(37.085,-10.749) ; v1@38.863,-12.146 v1(38.875,-12.158)
  Top w0.305: U4.1 30.887,-23.474 R3.2 30.493,-23.182 40.45,-23.182 41.174,-22.458 41.174,-12.704 40.628,-12.158 v1(38.875,-12.158)
  Bottom w0.254: v1(37.085,-10.749) 38.101,-10.749 38.875,-11.523 v1(38.875,-12.158)
IO_P1_3: U1.13
IO_P1_4: U1.14
IO_P1_5: U1.15
IO_P1_6: U1.16
IO_P1_7: U1.17
N$1: Q1.1 R1.1 | length 3.6
  Top w0.305: Q1.1@-1.13,-14.717 -1.13,-16.698 0.312,-16.698 R1.1
  Top w0.381: Q1.1 Q1.1@-1.13,-14.717
N$2: D1.A R2.2 | length 1.9
  Top w0.305: D1.A R2.2
N$3: Q2.4 | length 4.7
  Top w0.305: -1.13,-18.121 -1.555,-18.121 -2.26,-18.826 -2.26,-20.477 Q2.4
N$4: Q2.1 R5.2 | length 4.8
  Top w0.305: R5.2 1.753,-23.484 1.753,-22.56 2.668,-21.645 Q2.1
N$5: R6.1 R7.2 U3.1 | length 4.7
  Top w0.305: R6.1 R7.2 31.192,-8.412 32.183,-7.421 33.605,-7.421 U3.1
N$6: FAN_-.1 U3.3 | length 6.2
  Top w0.508: U3.3 v1@36.208,-9.974 ; v1(36.221,-9.987) v1@36.208,-9.974 ; v1(36.221,-9.504) 36.221,-9.961 v1@36.208,-9.974
  Bottom w0.508: v1(36.221,-9.504) v1(36.221,-9.987) 39.599,-9.987 FAN_-.1
N$7: R8.2 U1.24 | length 1.3
  Top w0.254: R8.2 30.78,-14.082 U1.24
N$8: Q3.4 R9.1 U4.3 | length 2.7
  Top w0.305: U4.3 33.211,-22.115 R9.1 34.555,-21.594 Q3.4
N$9: LED1.2 | length 2.8
  Top w0.508: LED1.2 7.949,-37.266 8.459,-37.266
N$10: LED2.2 | length 1.6
  Top w0.508: 11.329,-37.266 11.329,-38.884 LED2.2
N$11: LED3.2 | length 1.6
  Top w0.508: LED3.2 16.333,-38.883 16.333,-37.266
N$12: LED4.2 | length 1.6
  Top w0.508: LED4.2 21.337,-38.879 21.337,-37.266
N$13: D.P$2 X1.13 | length 9.1
  Top w0.254: D.P$2 18.54,-5.996 18.54,-12.065 18.08,-12.525 X1.13
SCL: SCL2.1 U1.19 U$1.P$3 X1.18 | length 30.2
  Top w0.254: X1.18 v1(20.58,-10.088) 20.58,-2.954 U$1.P$3 ; v1(31.065,-11.434) 31.212,-11.581 U1.19
  Top w0.305: U$1.P$3 21.87,-1.664 21.87,1.215 SCL2.1
  Bottom w0.254: v1(20.58,-10.088) 20.448,-10.22 20.448,-10.876 21.007,-11.434 v1(31.065,-11.434)
SDA: SDA2.1 U1.20 U$1.P$4 X1.17 | length 31.1
  Top w0.254: SDA2.1 19.33,-1.704 U$1.P$4 U$1.P$4@20.08,-2.458 ; X1.17 v1(20.08,-9.631) U$1.P$4@20.08,-2.458 ; U$1.P$4@20.08,-2.456 U$1.P$4@20.08,-2.458 ; v1(31.065,-12.061) 31.085,-12.081 U1.20
  Top w0.305: 17.679,1.215 SDA2.1
  Bottom w0.254: 20.067,-11.053 20.105,-11.091 ; v1(20.08,-9.631) 20.08,-10.049 20.067,-10.063 20.067,-11.033 20.105,-11.071 20.105,-11.091 ; v1(31.065,-12.061) 30.836,-12.061 30.608,-11.833 20.846,-11.833 20.105,-11.091
SW: S1.2 X1.11 | length 44.2
  Top w0.254: v1(14.25,-24.033) 14.25,-32.186 15.52,-33.456 v1(21.87,-33.456) ; v1(14.25,-22.966) v1(14.25,-19.359) ; X1.11 17.08,-15.915 v1(17.12,-15.956) ; v1(23.14,-37.266) 26.95,-41.076 26.95,-43.616 28.982,-45.648 S1.2
  Bottom w0.254: v1(14.25,-24.033) v1(14.25,-22.966) ; v1(14.25,-19.359) 14.25,-18.826 v1(17.12,-15.956) ; v1(21.87,-33.456) 22.505,-34.091 22.505,-36.631 v1(23.14,-37.266)
VDD: C1.2 R8.1 TP1.TP U1.18 U1.21 U1.23 X1.21 X1.22 X1.23 | length 20.7
  Top w0.127: U1.21 32.382,-12.581 32.411,-12.552 32.411,-11.622 32.482,-11.552 U1.18
  Top w0.254: X1.21 X1.22 X1.23 ; v1(27.534,-15.219) 27.534,-13.572 C1.2 ; 31.217,-12.605 31.243,-12.58 31.839,-12.58 U1.21
  Top w0.381: X1.22 22.58,-13.315 23.013,-12.882 23.013,-12.857 28.249,-12.857 C1.2 29.748,-12.022 R8.1 ; 31.217,-12.605 30.834,-12.605 R8.1 ; U1.23 31.307,-13.581 R8.1
  Bottom w0.152: v1(27.534,-15.219) TP1.TP
pads on no net: R4.1 R4.2 R10.1 R10.2 R11.1 R11.2 R12.1 R12.2 R13.1 R13.2 S1.S1 S1.S2 SCL1.1 SDA1.1 U1.22 X1.8 X1.9

## Polygon pours and split planes (outlines as drawn)
+5V_RPI on Top "Polygon_1_Net_+5V_RPI" (solid, remove dead copper, pour order 2): 35.967,-15.549 35.967,-23.423 41.047,-23.423 41.047,-15.549
ESC_+ on Top "Polygon_1_Net_ESC_+" (solid, remove dead copper, pour order 3): -4.927,3.501 7.519,3.501 7.519,-10.723 -4.927,-10.723
+12V on Top "Polygon_2_Net_+12V" (solid, remove dead copper, pour order 4): 8.027,4.009 8.027,-13.009 2.768,-13.009 1.423,-14.354 1.423,-16.999 2.768,-18.343 15.012,-18.343 15.012,4.009
+5V on Top "Polygon_1_Net_+5V" (solid, remove dead copper, pour order 1): 32.462,-18.165 35.637,-18.165 35.637,-20.985 32.462,-20.985
0V on Top "Polygon_6_Net_0V" (solid, remove dead copper, pour order 9): 31.911,-10.444 35.84,-10.444 37.263,-10.444 37.263,-15.829 30.565,-15.829
0V on Top "Polygon_5_Net_0V" (solid, remove dead copper, pour order 11): 15.393,-4.195 15.393,-55.63 30.659,-55.63 30.659,-4.195
0V on Top "Polygon_4_Net_0V" (solid, remove dead copper, pour order 6): 2.693,-39.754 3.403,-39.044 22.558,-39.044 24.537,-41.024 24.537,-42.852 25.199,-43.515 40.514,-43.515 40.514,-52.633 2.693,-52.633
0V on Top "Polygon_1_Net_0V" (solid, remove dead copper, pour order 10): 15.012,3.501 15.012,-3.484 14.504,-3.484 14.504,-7.548 42.317,-7.548 42.317,3.501
ESC_+ on Bottom "Polygon_2_Net_ESC_+" (solid, remove dead copper, pour order 5): -6.197,4.771 7.519,4.771 7.519,-10.723 -3.657,-10.723 -3.657,-9.453 -6.197,-9.453
+12V on Bottom "Polygon_3_Net_+12V" (solid, remove dead copper, pour order 0): 12.421,-15.067 12.421,-17.099 14.453,-17.099 14.453,-14.94 12.75,-14.94 12.623,-15.067
0V on Bottom "Polygon_3_Net_0V" (solid, remove dead copper, pour order 8): 16.193,3.437 16.193,-13.2 33.364,-13.2 33.364,3.437
0V on Bottom "C" (solid, remove dead copper, pour order 12): 9.17,4.771 9.17,-11.433 7.594,-13.009 -4.927,-13.009 -4.927,-55.173 42.317,-55.173 42.317,4.771

## Keep-outs
Keep-Out Layer:
  the board outline again, w0.152

## Silkscreen, mask and mechanical layers (free items; w line width, h text height)
Top Overlay:
  text "+" at 39.457,-4.204 h1.94
  text "_" at 39.616,-8.487 h1.62
  text "FAN" at 38.418,-10.036 h1.94 r90
  text "SPSU" at 15.226,-24.566 h2.16
  text ">VERSION_PCB" at 6.8,-35.133 h2.16
Dimension:
  the board outline again, w0.152
tPlace:
  drawing of 1847 lines, arcs and shapes, not listed
Document:
  circle w0.152: c38.653,-0.004 r2.25
  circle w0.152: c0.007,-0.004 r2.25

## Text inside footprints (layer, text, board x,y; h text height)
LED1: Measures "0.138in/3.505mm" at 11.41,-44.245 h0.54 r90; Measures "0.11in/2.794mm" at 6.635,-32.866 h0.54 r90; Measures "0.079in/2.007mm" at 6.635,-35.406 h0.54 r90; Measures "0.08in/2.032mm" at 3.536,-44.702 h0.54 r90; Measures "0.138in/3.505mm" at 0.996,-44.245 h0.54 r90; Measures "Alt 2 Padstyle: OX90Y60D30P" at 21.265,-55.014 h1.08 r90; Measures "Alt 1 Padstyle: OX60Y90D30P" at 19.386,-55.014 h1.08 r90; Measures "2nd Padstyle: RX42Y77D0T" at 17.455,-53.668 h1.08 r90; Measures "1st Padstyle: RX84Y77D0T" at 15.576,-53.465 h1.08 r90; tDocu "*" at 6.965,-42.289 h1.08 r90; tPlace "*" at 6.965,-43.026 h1.08 r90
LED2: Measures "0.138in/3.505mm" at 16.41,-44.245 h0.54 r90; Measures "0.11in/2.794mm" at 11.635,-32.866 h0.54 r90; Measures "0.079in/2.007mm" at 11.635,-35.406 h0.54 r90; Measures "0.08in/2.032mm" at 8.536,-44.702 h0.54 r90; Measures "0.138in/3.505mm" at 5.996,-44.245 h0.54 r90; Measures "Alt 2 Padstyle: OX90Y60D30P" at 26.265,-55.014 h1.08 r90; Measures "Alt 1 Padstyle: OX60Y90D30P" at 24.386,-55.014 h1.08 r90; Measures "2nd Padstyle: RX42Y77D0T" at 22.455,-53.668 h1.08 r90; Measures "1st Padstyle: RX84Y77D0T" at 20.576,-53.465 h1.08 r90; tDocu "*" at 11.965,-42.289 h1.08 r90; tPlace "*" at 11.965,-43.026 h1.08 r90
LED3: Measures "0.138in/3.505mm" at 21.41,-44.245 h0.54 r90; Measures "0.11in/2.794mm" at 16.635,-32.866 h0.54 r90; Measures "0.079in/2.007mm" at 16.635,-35.406 h0.54 r90; Measures "0.08in/2.032mm" at 13.536,-44.702 h0.54 r90; Measures "0.138in/3.505mm" at 10.996,-44.245 h0.54 r90; Measures "Alt 2 Padstyle: OX90Y60D30P" at 31.265,-55.014 h1.08 r90; Measures "Alt 1 Padstyle: OX60Y90D30P" at 29.386,-55.014 h1.08 r90; Measures "2nd Padstyle: RX42Y77D0T" at 27.455,-53.668 h1.08 r90; Measures "1st Padstyle: RX84Y77D0T" at 25.576,-53.465 h1.08 r90; tDocu "*" at 16.965,-42.289 h1.08 r90; tPlace "*" at 16.965,-43.026 h1.08 r90
LED4: Measures "0.138in/3.505mm" at 26.41,-44.245 h0.54 r90; Measures "0.11in/2.794mm" at 21.635,-32.866 h0.54 r90; Measures "0.079in/2.007mm" at 21.635,-35.406 h0.54 r90; Measures "0.08in/2.032mm" at 18.536,-44.702 h0.54 r90; Measures "0.138in/3.505mm" at 15.996,-44.245 h0.54 r90; Measures "Alt 2 Padstyle: OX90Y60D30P" at 36.265,-55.014 h1.08 r90; Measures "Alt 1 Padstyle: OX60Y90D30P" at 34.386,-55.014 h1.08 r90; Measures "2nd Padstyle: RX42Y77D0T" at 32.455,-53.668 h1.08 r90; Measures "1st Padstyle: RX84Y77D0T" at 30.576,-53.465 h1.08 r90; tDocu "*" at 21.965,-42.289 h1.08 r90; tPlace "*" at 21.965,-43.026 h1.08 r90
Q2: Measures "0.035in/0.889mm" at 9.297,-15.194 h0.54 r180; Measures "0.1in/2.54mm" at 14.606,-20.07 h0.54 r180; Measures "0.169in/4.293mm" at -3.174,-20.07 h0.54 r180; Measures "0.287in/7.29mm" at 5.817,-26.827 h0.54 r180; Measures "0.173in/4.394mm" at 6.097,-24.947 h0.54 r180; Measures "Alt 2 Padstyle: OX90Y60D30P" at 16.866,-5.542 h1.08 r180; Measures "Alt 1 Padstyle: OX60Y90D30P" at 16.866,-7.066 h1.08 r180; Measures "Pin One Padstyle: RX51Y20D0T" at 17.628,-11.638 h1.08 r180; Measures "Default Padstyle: RX51Y20D0T" at 17.273,-13.162 h1.08 r180; tDocu "*" at 4.446,-21.188 h1.08 r180
Q3: Measures "0.13in/3.302mm" at 32.767,-25.582 h0.54; Measures "0.13in/3.302mm" at 41.174,-20.553 h0.54; Measures "0.026in/0.65mm" at 24.359,-19.918 h0.54; Measures "0.018in/0.457mm" at 31.04,-16.235 h0.54; Measures "0.132in/3.353mm" at 32.487,-12.425 h0.54; Measures "Alt 2 Padstyle: OX90Y60D30P" at 21.718,-37.393 h1.08; Measures "Alt 1 Padstyle: OX60Y90D30P" at 21.718,-35.869 h1.08; Measures "Heat Tab Padstyle: RX63Y89D0T" at 20.372,-32.821 h1.08; Measures "Default Padstyle: RX30Y13D0T" at 21.311,-31.297 h1.08
TP1: Bottom 3D Body ">TP_SIGNAL_NAME" at 27.534,-16.21 h0.85
U1: Measures "0.161in/4.089mm" at 40.184,-16.87 h0.54 r90; Measures "0.161in/4.089mm" at 34.037,-26.751 h0.54 r90; Measures "0.161in/4.089mm" at 34.037,-5.745 h0.54 r90; Measures "0.161in/4.089mm" at 26.645,-16.87 h0.54 r90; Measures "0.02in/0.508mm" at 28.55,-14.787 h0.54 r90; Measures "0.02in/0.5mm" at 33.046,-7.65 h0.54 r90; Measures "Alt 2 Padstyle: b229_152h76" at 49.937,-27.64 h1.08 r90; Measures "Alt 1 Padstyle: b152_229h76" at 48.413,-27.64 h1.08 r90; Measures "Heat Tab Padstyle: r226_226" at 45.365,-27.843 h1.08 r90; Measures "Default Padstyle: r25_71" at 43.841,-25.735 h1.08 r90
U3: Measures "0.056in/1.422mm" at 34.824,3.831 h0.54 r270; Measures "0.119in/3.023mm" at 41.987,-4.78 h0.54 r270; Measures "0.019in/0.483mm" at 39.447,-4.78 h0.54 r270; Measures "0.075in/1.905mm" at 30.201,-4.78 h0.54 r270; Measures "0.018in/0.457mm" at 35.84,-12.73 h0.54 r270; Measures "0.099in/2.515mm" at 34.824,-14.66 h0.54 r270; Measures "Alt 2 Padstyle: OX90Y60D30P" at 21.261,5.99 h1.08 r270; Measures "Alt 1 Padstyle: OX60Y90D30P" at 23.14,5.99 h1.08 r270; Measures "Bottom Padstyle: RX23Y58D0T" at 25.071,5.99 h1.08 r270; Measures "Top Padstyle: RX23Y58D0T" at 26.95,4.644 h1.08 r270
U4: Measures "0.056in/1.422mm" at 19.991,-23.499 h0.54; Measures "0.119in/3.023mm" at 28.601,-16.337 h0.54; Measures "0.019in/0.483mm" at 28.601,-18.877 h0.54; Measures "0.075in/1.905mm" at 28.601,-28.122 h0.54; Measures "0.018in/0.457mm" at 36.551,-22.483 h0.54; Measures "0.099in/2.515mm" at 38.482,-23.499 h0.54; Measures "Alt 2 Padstyle: OX90Y60D30P" at 17.832,-37.063 h1.08; Measures "Alt 1 Padstyle: OX60Y90D30P" at 17.832,-35.183 h1.08; Measures "Bottom Padstyle: RX23Y58D0T" at 17.832,-33.253 h1.08; Measures "Top Padstyle: RX23Y58D0T" at 19.178,-31.373 h1.08